# Altium PCB BOARD_4LAYER.PcbDoc (part 17 of 21)
Units mil, origin at the board's own origin, x right, y up, seen from the top; angles counter-clockwise.
Board outline 6692.91 x 10039.37 mil, 4 copper layers (Top Layer, Mid Layer 1, Mid Layer 2, Bottom Layer), stack 66.299 mil thick; 1532 components, 908 nets, 4105 pads, 1286 vias.
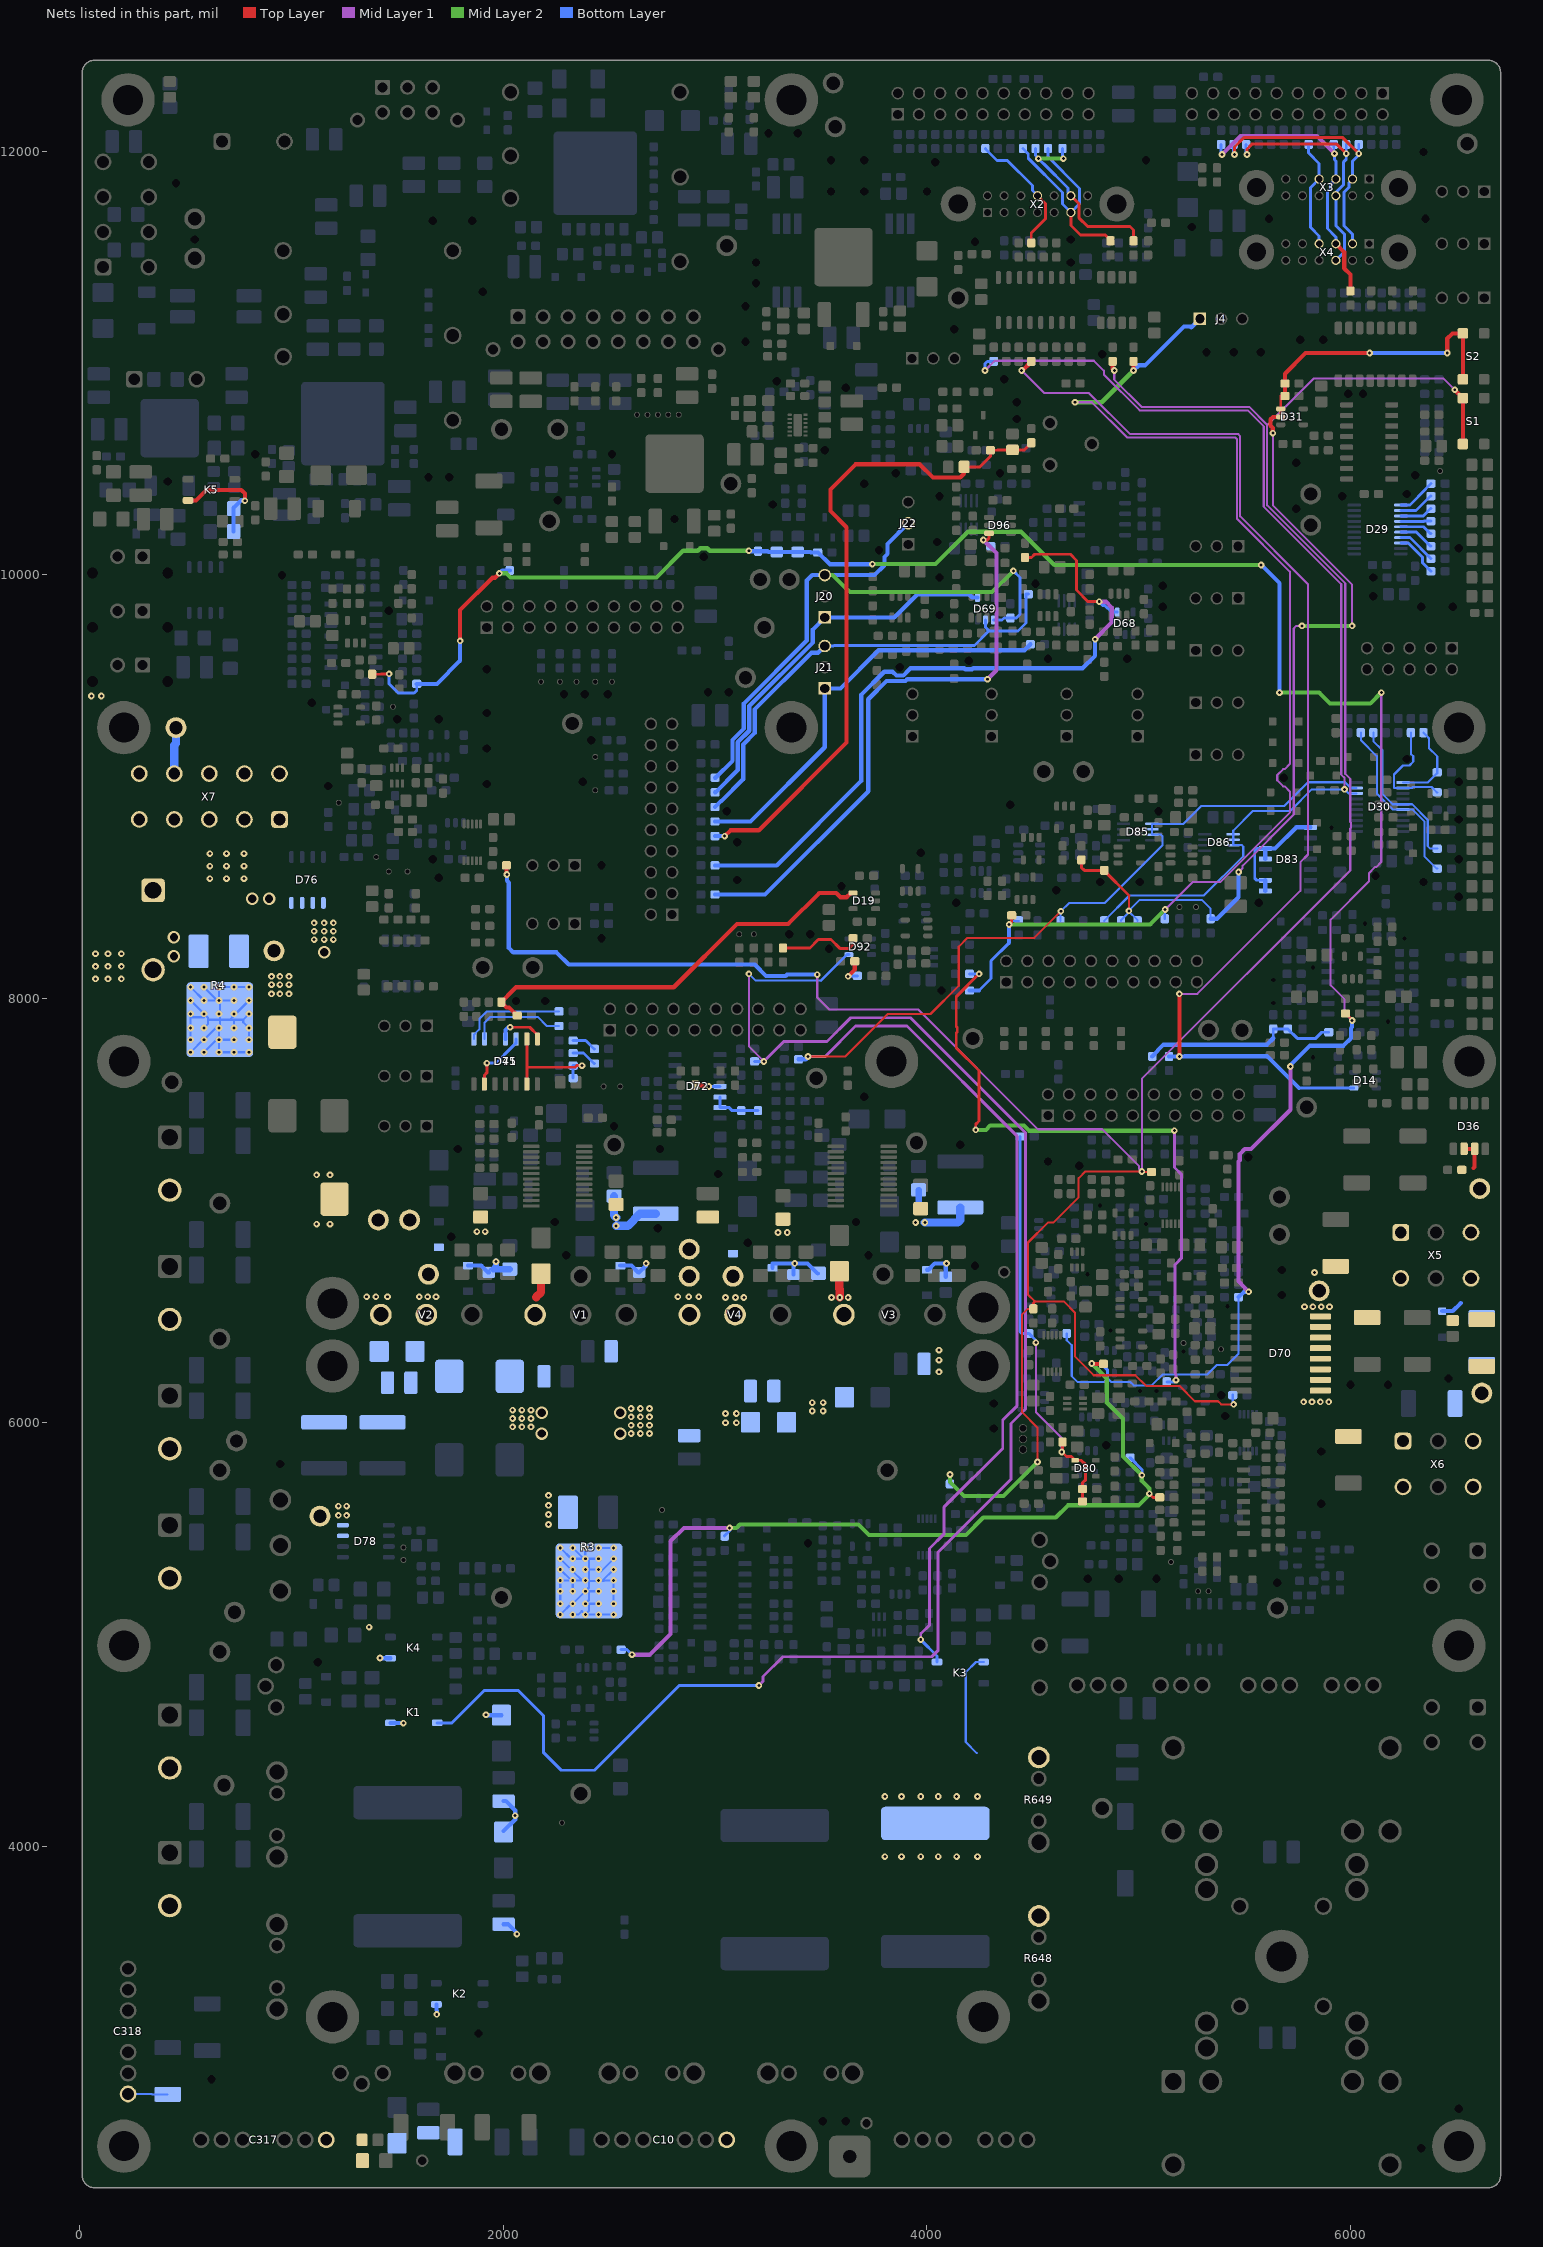
[diagram p19: the nets of this part, all layers, seen from the top]

## Via types
v1: diameter 27.56/31.5/31.5/27.56 (per signal layer), hole 13.78, Top Layer to Bottom Layer, 1270 vias
v2: diameter 59.06, hole 39.37, Top Layer to Bottom Layer, 16 vias

## Nets (pads, with @x,y where several pads share a name; then routed paths per layer and width w, separated by ;. In a path a pad name is that pad's centre, name@x,y a point inside that pad or via, vN(x,y) a via of type N, cw(c..) or ccw(c..) an arc to the next point about the centre after c; other vN are vias at no path point) (continued)
IND_BLOCING_T: D30.16 R159.1 R166.1 | length 846.7
  Bottom Layer w10: R166.1@6047.24,9255.91 6047.24,9220.99 6122.77,9145.47 6122.77,8968.73 6198.78,8892.72 D30.16@6246.06,8892.72 6292.05,8892.72 6347.2,8837.56 6347.2,8672.48 6405.51,8614.17 R159.1@6407.48,8614.17
IND_BLOCING_Z: D30.15 R158.1 R169.2 | length 744.7
  Bottom Layer w10: R169.2@6106.3,9255.91 6106.3,9215.99 6148.19,9174.11 6148.19,8967.59 6197.47,8918.31 D30.15@6246.06,8918.31 6288.95,8918.31 6363.11,8844.15 6363.11,8720.47 6374.92,8708.66 R158.1@6407.48,8708.66
IND_DELAY_WRITE: D30.12 R161.1 R167.1 | length 536.6
  Bottom Layer w10: R167.1@6283.46,9255.91 6283.46,9155.47 6294.37,9144.56 6294.37,9119.22 6276.45,9101.3 6246.37,9101.3 6203.66,9058.59 6203.66,8995.08 D30.12@6246.06,8995.08 6288.46,8995.08 6292.89,8999.5 6380.42,8999.5 6405.51,8974.41 R161.1@6407.48,8974.41
IND_DISCHARGE_CAP: D30.11 R162.1 R171.2 | length 398.8
  Bottom Layer w10: D30.11@6246.06,9020.67 6363.19,9020.67 6405.51,9062.99 6407.48,9062.99 R162.1@6407.48,9068.9 6407.48,9144.02 6368.86,9182.64 6368.86,9227.6 6367.61,9228.85 6367.61,9230.82 R171.2@6342.52,9255.91
IZL: D14.4 R13.2 R483.1 | length 5519.2
  Top Layer w19.68: v1(4446.85,10964.57) 4450.79,10964.57 4492.13,11005.91 R13.2@4492.13,11007.87 ; v1(5190.94,7728.35) v1(5190.94,8023.62)
  Mid Layer 1 w10: v1(4446.85,10964.57) 4552.55,10858.87 4764.04,10858.87 4958.44,10664.46 5468.56,10664.46 5477.88,10655.15 5477.88,10276.32 5798.05,9956.15 5798.05,8681.38 5761.93,8645.25 5761.93,8509.47 5276.08,8023.62 v1(5190.94,8023.62)
  Bottom Layer w13.78: 5754.72,7578.74 D14.4@6013.78,7578.74
  Bottom Layer w19.68: R483.1@5141.73,7728.35 v1(5190.94,7728.35) 5215.63,7728.35 5216.69,7729.41 5604.05,7729.41 5754.72,7578.74
IZL_A: C234.2 R345.1 R476.1 R491.1 | length 944.1
  Bottom Layer w13.78: 5633.86,7813.88 C234.2@5633.86,7858.27 R345.1@5702.76,7858.27 5747.37,7813.65 5834.24,7813.65 5863.11,7842.52 R491.1@5895.67,7842.52
  Bottom Layer w19.68: R476.1@5062.99,7728.35 5088.08,7753.44 5088.08,7755.41 5116.38,7783.7 5603.68,7783.7 5633.86,7813.88
IZL_UM: R9.1 R443.1 X2.11 | length 619.5
  Top Layer w13.78: R9.1@4492.13,11566.93 4492.13,11614.09 4560.07,11682.04 4560.07,11750.95 X2.11@4521.65,11789.37
  Bottom Layer w13.78: R443.1@4275.59,12011.81 4275.59,12009.84 4330.37,11955.07 4379.28,11955.07 4497.29,11837.05 4497.29,11813.73 X2.11@4521.65,11789.37
OFF_220V_PS: R429.1 X3.4 X4.4 | length 522.1
  Bottom Layer w13.78: R429.1@5801.18,12031.5 5801.18,11990.56 5850.39,11941.35 X3.4@5850.39,11868.11 5810.35,11828.07 5810.35,11639.89 5850.39,11599.85 X4.4@5850.39,11562.99
OFF_MOST: R49.1 R118.2 | length 400.2
  Top Layer w13.78: R49.1@3320.87,8240.16 3447.51,8240.16 3487.35,8280 3547.01,8280 3588.76,8238.25 3631.94,8238.25 3651.57,8257.89 R118.2@3651.57,8285.43
OFF_POWER: R47.2 R112.2 | length 128
  Top Layer w19.68: v1(3627.95,8106.3) 3659.45,8137.8 R47.2@3659.45,8177.17
  Bottom Layer w13.78: v1(3627.95,8106.3) 3629.92,8108.27 R112.2@3671.26,8108.27
ON/OFF_GEN: D68.4 R122.2 R515.1 | length 3426.8
  Top Layer w13.78: R122.2@4462.6,10082.68 4493.19,10082.68 4508.26,10097.74 4676.79,10097.74 4705.66,10068.87 4705.66,9928.5 4760.15,9874.02 v1(4812.99,9874.02)
  Mid Layer 1 w19.68: v1(4793.31,9696.85) 4871.6,9775.15 4871.6,9846.9 4844.49,9874.02 v1(4812.99,9874.02)
  Bottom Layer w13.78: v1(4812.99,9874.02) 4831.93,9855.07 4840.13,9855.07 4870.41,9824.8 D68.4@4897.64,9824.8
  Bottom Layer w19.68: R515.1@3000,8629.92 3291.17,8629.92 3689.6,9028.35 3689.6,9434.53 3798.4,9543.34 3837.77,9543.34 3855.67,9525.43 3888.42,9525.43 3911.57,9548.59 3922.72,9559.73 4175.71,9559.73 4180.48,9554.96 4213.22,9554.96 4217.99,9559.73 4734.56,9559.73 4793.31,9618.48 v1(4793.31,9696.85)
ON/OFF_MC: J4.1 R11.2 R109.1 R110.1 R114.2 R496.1 | length 5663.4
  Top Layer w13.78: v1(4387.8,8350.39) 4399.61,8362.2 R110.1@4399.61,8393.7
  Top Layer w19.68: v1(4974.41,10964.57) R11.2@4974.41,11007.87
  Mid Layer 1 w10: v1(4698.82,10814.96) 4777.9,10814.96 4944.3,10648.56 5454.91,10648.56 5461.98,10641.49 5461.98,10266.15 5712.13,10016 5712.13,9108.04 5687.98,9083.9 5680.4,9083.9 5652.48,9055.98 5652.48,9030.64 5680.4,9002.72 5687.98,9002.72 5712.13,8978.57 5712.13,8878.61 5385.68,8552.17 5254.92,8552.17 v1(5124.02,8421.26)
  Mid Layer 2 w19.68: v1(4387.8,8350.39) 5053.15,8350.39 v1(5124.02,8421.26) ; v1(4698.82,10814.96) 4824.54,10814.96 4951.87,10942.3 4952.14,10942.3 v1(4974.41,10964.57)
  Bottom Layer w10: v1@4387.8,8353.43 4402.48,8368.11 R496.1@4433.07,8368.11 ; R114.2@5122.05,8377.95 5122.05,8419.29 v1(5124.02,8421.26)
  Bottom Layer w13.78: 4245.36,8039.37 4302.17,8096.18 4302.17,8179.25 4387.8,8264.88
  Bottom Layer w19.68: R109.1@4200.79,8039.37 4245.36,8039.37 ; 4387.8,8264.88 v1(4387.8,8350.39) v1@4387.8,8353.43 ; v1(4974.41,10964.57) 4999.09,10989.25 5029,10989.25 5212.36,11172.61 5242.52,11172.61 5247.13,11168 J4.1@5287.8,11208.66
ON/OFF_PS: R29.2 R431.1 X3.2 X4.2 | length 1233
  Top Layer w13.78: v1(5450.79,11984.25) 5450.79,12019.03 5495.07,12063.32 5962.27,12063.32 v1(6037.4,11988.19)
  Bottom Layer w13.78: R29.2@5446.85,12031.5 5446.85,11988.19 v1(5450.79,11984.25) ; X4.2@6007.87,11562.99 6007.87,11607.79 5968.62,11647.04 5968.62,11807.04 5992.24,11830.67 5992.24,11852.48 X3.2@6007.87,11868.11 6007.87,11951.97 6037.4,11981.5 v1(6037.4,11988.19) R431.1@6037.4,12031.5
ON/OFF_UM: R34.2 R442.1 R615.1 X2.13 | length 910.8
  Top Layer w13.78: X2.13@4679.13,11789.37 4716.35,11752.15 4716.35,11685.81 4758.54,11643.62 4958.16,11643.62 4974.41,11627.38 R615.1@4974.41,11576.77
  Mid Layer 2 w19.68: v1(4525.59,11964.57) v1(4643.7,11964.57)
  Bottom Layer w13.78: R442.1@4511.81,12011.81 4511.81,11978.74 4525.59,11964.96 v1(4525.59,11964.57) 4550.28,11939.88 4550.67,11939.88 4665.2,11825.35 4665.2,11803.31 X2.13@4679.13,11789.37 ; R34.2@4639.76,12011.81 4639.76,11968.5 v1(4643.7,11964.57)
ON_POWER: D92.4 K1.2 R459.1 | length 8111.8
  Mid Layer 1 w10: v1(3159.45,8118.11) 3159.45,7775.59 v1(3230.32,7704.72)
  Mid Layer 1 w13.78: v1(3206.69,4759.84) 3226.88,4780.03 3226.88,4802.28 3320.4,4895.81 4022.95,4895.81 4051.22,4924.08 4051.22,5387.19 4396.92,5732.89 4396.92,5995.94 4465.13,6064.15 4465.13,7368.03 3922.21,7910.95 3640.08,7910.95 3527.9,7798.77 3324.36,7798.77 v1(3230.32,7704.72)
  Bottom Layer w10: v1(3159.45,8118.11) 3190.52,8087.04 3500.43,8087.04
  Bottom Layer w13.78: K1.2@1688.98,4583.86 1758.19,4583.86 1910.69,4736.36 2071.52,4736.36 2189.69,4618.19 2189.69,4444.81 2274.47,4360.04 2430.87,4360.04 2830.67,4759.84 v1(3206.69,4759.84) ; R459.1@3187.01,7704.72 v1(3230.32,7704.72) ; 3500.43,8087.04 3622.05,8208.66 D92.4@3631.89,8208.66
ON_VENT: K5.4 R577.1 R578.1 | length 511.2
  Top Layer w19.68: K5.4@513.78,10351.57 550.56,10351.57 600.18,10401.2 764.54,10401.2 781.5,10384.24 v1(781.5,10350.39)
  Bottom Layer w10: R578.1@728.35,10312.99 R578.1@728.35,10316.93
  Bottom Layer w19.68: R577.1@728.35,10204.72 R578.1@728.35,10312.99 ; R578.1@728.35,10316.93 765.25,10353.83 778.06,10353.83 v1(781.5,10350.39)
OUT_EN: D75.2 D75.13 R42.1 R579.2 | length 576.4
  Top Layer w13.78: D75.13@2111.81,7598.43 2111.81,7676.77 2112.2,7677.17 ; D75.2@2111.81,7811.02 2111.81,7677.56 2112.2,7677.17 ; v1(2372.05,7685.04) 2347.36,7685.04 2339.49,7677.17 2112.2,7677.17
  Bottom Layer w13.78: R579.2@2330.71,7625.98 R42.1@2330.71,7685.04 v1(2372.05,7685.04)
OUT_EN_OSC: R463.1 R584.2 | length 120.8
  Bottom Layer w13.78: R584.2@2330.71,7744.09 2379.92,7744.09 2429.13,7694.88 R463.1@2431.1,7694.88
OUT_F: D41.4 D75.1 | length 230.9
  Top Layer w13.78: v1(2033.46,7866.14) 2125.39,7866.14 2161.81,7829.72 D75.1@2161.81,7811.02
  Bottom Layer w19.68: D41.4@2011.81,7811.02 2011.81,7852.44 2025.51,7866.14 v1(2033.46,7866.14)
OUT_F_OSC: D41.1 R451.1 | length 495.4
  Bottom Layer w10: D41.1@1861.81,7811.02 1861.81,7829.72 1888.11,7856.03 1888.11,7904.99 1924.06,7940.94 R451.1@2263.78,7940.94
OUT_GEN: D96.6 R124.1 R507.1 | length 2763
  Top Layer w13.78: v1(4265.75,10165.35) 4284.53,10165.35 4292.91,10173.74 D96.6@4292.91,10196.85
  Mid Layer 1 w19.68: v1(4265.75,10165.35) 4328.14,10102.97 4328.14,9550.58 v1(4285.43,9507.87)
  Bottom Layer w13.78: v1(4265.75,10165.35) 4269.69,10165.35 4299.21,10135.83 R124.1@4301.18,10135.83
  Bottom Layer w19.68: R507.1@3000,8492.13 3235.78,8492.13 3722.91,8979.25 3722.91,9413.51 3809.24,9499.84 3845.07,9499.84 3899.02,9499.84 3907.07,9507.89 4260.73,9507.89 ; 4260.75,9507.87 v1(4285.43,9507.87)
OUT_GEN_EN: D69.2 J21.3 R123.2 R516.1 | length 2193.7
  Bottom Layer w13.78: J21.3@3517.72,9664.96 3558.15,9664.96 3560.5,9667.31 3762.55,9667.31 3762.59,9667.35 4223.81,9667.35 4291.75,9735.3 ; D69.2@4275.59,9787.4 4275.59,9752.95 4291.75,9736.79 4291.75,9735.3 ; R123.2@4478.35,9909.45 4467.11,9909.45 4467.11,9772.93 4429.48,9735.3 4317.85,9735.3 4291.75,9735.3
  Bottom Layer w19.68: R516.1@3000,8905.51 3028.51,8934.03 3030.48,8934.03 3132.97,9036.51 3132.97,9200.51 3187.03,9254.57 3187.03,9364.97 3455,9632.95 3485.7,9632.95 J21.3@3517.72,9664.96
OUT_GEN_F: D69.1 J20.3 J22.2 R508.1 R754.1 | length 3071.4
  Mid Layer 2 w19.68: J20.3@3517.72,9999.61 3554.21,9999.61 3615.34,9938.48 3616.89,9938.48 3636.35,9919.02 4306.82,9919.02 v1(4407.48,10019.68)
  Bottom Layer w13.78: D69.1@4312.99,9787.4 4353.27,9787.4 4363.11,9797.24 R754.1@4393.7,9797.24 4421.09,9797.24 4438.83,9814.98 4438.83,9988.34 v1(4407.48,10019.68)
  Bottom Layer w19.68: R508.1@3000,9043.31 3001.97,9043.31 3081.79,9123.13 3081.79,9221.71 3135.85,9275.77 3135.85,9393.19 3432.86,9690.21 3432.86,9973.56 3458.91,9999.61 J20.3@3517.72,9999.61 3752.87,9999.61 3798.94,10045.67 3798.94,10085.56 3813.15,10099.77 3813.15,10132.51 3813.15,10145.83 J22.2@3911.42,10244.09
OUT_GEN_F1: D69.4 J20.1 R630.2 | length 1812.9
  Bottom Layer w19.68: R630.2@3000,8974.41 3001.97,8974.41 3107.38,9079.82 3107.38,9211.11 3161.44,9265.17 3161.44,9381.7 3461.42,9681.68 3461.42,9743.31 J20.1@3517.72,9799.61 3845.68,9799.61 3955.1,9909.03 4198.26,9909.03 4213.58,9893.7 D69.4@4238.19,9893.7
PGND: C1.2 C2.2 C3.1 C8.1 C9.1 C10.1 C283.1 C285.1 C307.1 C308.1 C317.1 C318.1 H2.2 K1.3 K2.3 K3.3 K4.3 L15.2 R3.3 R4.3 R544.2 R601.2 R603.2 R604.2 R608.1 R609.1 R636.1 R640.1 R648.1 R649.1 TP1.1 TP2.1 TP3.1 TP4.1 V2.3 V4.3 V42.2 V43.2 V44.1 V53.2 V55.2 V59.2 V60.2 V61.2 X9.2 X10.2 X11.2 X12.2 X13.2 X14.2 | length 6163.9
  Bottom Layer w10: C318.1@230.31,2832.68 341.46,2832.68 343.43,2830.71 R640.1@417.32,2830.71 ; v1(525.59,7748.03) 586.61,7809.06 v1(588.58,7807.09) 647.64,7866.14 R4.3@663.39,7866.14 ; v1(525.59,7807.09) v1(525.59,7862.2) R4.3@525.59,7913.39 ; v1(525.59,7929.13) R4.3@525.59,7913.39 ; v1(525.59,7992.13) v1(588.58,7929.13) ; v1(525.59,8055.12) v1(588.58,7992.13) R4.3@651.57,7992.13 ; v1(588.58,7748.03) 647.64,7807.09 v1(659.45,7807.09) ; v1(588.58,7862.2) 608.27,7881.89 R4.3@608.27,7901.57 ; v1(588.58,8055.12) R4.3@651.57,7992.13 ; v1(659.45,7929.13) R4.3@663.39,7929.13 ; v1(730.32,7807.09) R4.3@663.39,7807.09 ; v1(730.32,7862.2) R4.3@730.32,7901.57 ; v1(730.32,7929.13) R4.3@730.32,7921.26 ; v1(730.32,7992.13) R4.3@663.39,7992.13 ; v1(801.18,7748.03) v1(730.32,7748.03) v1(659.45,7748.03) 659.45,7803.15 R4.3@663.39,7807.09 ; v1(801.18,7807.09) v1(801.18,7862.2) 773.62,7889.76 R4.3@773.62,7901.57 ; v1(801.18,7929.13) R4.3@773.62,7901.57 ; v1(801.18,7992.13) R4.3@730.32,7921.26 ; v1(801.18,8055.12) v1(730.32,8055.12) v1(659.45,8055.12) v1(659.45,7992.13) ; C283.1@1933.07,6708.66 1933.07,6718.5 1938.98,6724.41 C283.1@1953.62,6724.41 ; V60.2@2001.97,4068.9 V60.2@2001.97,4072.83 ; v1(2269.68,5094.49) 2324.8,5149.61 v1(2328.74,5145.67) v1(2387.8,5204.72) ; v1(2269.68,5145.67) v1(2269.68,5204.72) v1(2269.68,5255.91) R3.3@2320.87,5255.91 ; v1(2269.68,5307.09) R3.3@2320.87,5255.91 ; v1(2269.68,5358.27) R3.3@2328.74,5299.21 ; v1(2269.68,5409.45) 2324.8,5354.33 v1(2328.74,5358.27) R3.3@2379.92,5358.27 ; v1(2328.74,5094.49) 2354.33,5094.49 2371.06,5111.22 v1(2387.8,5094.49) ; v1(2328.74,5204.72) v1(2328.74,5255.91) ; v1(2328.74,5307.09) R3.3@2328.74,5299.21 ; v1(2328.74,5409.45) R3.3@2379.92,5358.27 ; v1(2387.8,5307.09) R3.3@2405.51,5307.09 ; v1(2450.79,5145.67) R3.3@2405.51,5145.67 ; v1(2450.79,5204.72) R3.3@2405.51,5204.72 ; v1(2450.79,5255.91) R3.3@2450.79,5253.94 ; v1(2450.79,5358.27) 2405.51,5358.27 R3.3@2405.51,5355.17 ; v1(2521.65,5094.49) v1(2450.79,5094.49) v1(2387.8,5094.49) ; v1(2521.65,5145.67) v1(2521.65,5204.72) v1(2521.65,5255.91) 2477.44,5255.91 2475.47,5253.94 R3.3@2468.5,5253.94 ; v1(2521.65,5307.09) R3.3@2468.5,5253.94 ; v1(2521.65,5358.27) 2460.63,5297.24 v1(2450.79,5307.09) R3.3@2405.51,5307.09 ; v1(2521.65,5409.45) v1(2450.79,5409.45) v1(2387.8,5409.45) 2387.8,5372.89 R3.3@2402.42,5358.27 ; C308.1@3484.25,6704.72 C308.1@3488.19,6704.72 ; 4235.02,4441.18 4183.03,4493.17 4183.03,4822.68 4231.22,4870.87 K3.3@4267.72,4870.87 ; R4.3@525.59,7913.39 588.58,7913.39 v1(588.58,7929.13) ; v1(588.58,7929.13) 608.27,7909.45 R4.3@608.27,7901.57 ; R4.3@608.27,7901.57 R4.3@663.39,7901.57 ; R4.3@651.57,7992.13 v1(659.45,7992.13) ; v1(659.45,7807.09) R4.3@663.39,7807.09 ; v1(659.45,7807.09) v1(659.45,7862.2) R4.3@663.39,7866.14 ; v1(659.45,7992.13) R4.3@663.39,7992.13 ; R4.3@663.39,7866.14 R4.3@663.39,7901.57 ; R4.3@663.39,7901.57 R4.3@710.63,7901.57 ; R4.3@663.39,7901.57 R4.3@663.39,7929.13 ; R4.3@663.39,7929.13 R4.3@663.39,7992.13 ; R4.3@710.63,7901.57 R4.3@730.32,7901.57 ; R4.3@710.63,7901.57 R4.3@730.32,7921.26 ; R4.3@730.32,7901.57 R4.3@773.62,7901.57 ; R3.3@2320.87,5255.91 v1(2328.74,5255.91) ; v1(2328.74,5255.91) R3.3@2372.05,5255.91 ; R3.3@2328.74,5299.21 R3.3@2372.05,5255.91 ; R3.3@2372.05,5255.91 v1(2387.8,5255.91) 2389.76,5253.94 R3.3@2405.51,5253.94 ; R3.3@2379.92,5358.27 v1(2387.8,5358.27) R3.3@2402.42,5358.27 ; v1(2387.8,5094.49) 2405.51,5112.2 R3.3@2405.51,5145.67 ; v1(2387.8,5204.72) 2405.51,5222.44 R3.3@2405.51,5253.94 ; v1(2387.8,5204.72) R3.3@2405.51,5204.72 ; R3.3@2402.42,5358.27 R3.3@2405.51,5355.17 ; R3.3@2405.51,5145.67 v1(2387.8,5145.67) 2405.51,5163.39 R3.3@2405.51,5204.72 ; R3.3@2405.51,5253.94 R3.3@2450.79,5253.94 ; R3.3@2405.51,5253.94 R3.3@2405.51,5307.09 ; R3.3@2405.51,5307.09 R3.3@2405.51,5355.17 ; R3.3@2450.79,5253.94 R3.3@2468.5,5253.94
  Bottom Layer w19.68: v1(1419.29,4889.76) 1420.08,4888.98 K4.3@1468.5,4888.98 ; K1.3@1468.5,4583.86 1528.35,4583.86 v1(1529.53,4582.68) ; K2.3@1685.04,3255.12 1685.04,3228.46 1688.44,3225.06 1688.44,3210.1 v1(1687.01,3208.66) ; V53.2@1834.65,6741.14 1896.65,6741.14 1929.13,6708.66 C283.1@1933.07,6708.66 ; v1(1919.29,4622.05) 1921.26,4620.08 V61.2@1992.13,4620.08 ; C8.1@2001.97,3633.86 2023.62,3633.86 2064.96,3592.52 v1(2064.96,3586.61) ; V60.2@2001.97,4072.83 2057.09,4127.95 v1(2057.09,4145.67) 2057.09,4170.37 2012.89,4214.57 C9.1@2001.97,4214.57 ; V55.2@3271.65,6731.3 3271.65,6751.97 v1@3372.05,6751.97 ; C285.1@3370.08,6698.82 3370.08,6750 v1@3372.05,6751.97 ; C308.1@3484.25,6704.72 3437.01,6751.97 v1(3375.98,6751.97) v1@3372.05,6751.97
  Bottom Layer w29.53: v1(1966.54,6759.84) 1966.54,6737.32 1953.62,6724.41 C307.1@2031.5,6724.41
  other v1: 3801.18,3952.76 3879.92,3952.76 3970.47,3952.76 4053.15,3952.76 4139.76,3952.76 4238.19,3952.76 3801.18,4236.22 3879.92,4236.22 3970.47,4236.22 4053.15,4236.22 4139.76,4236.22 4238.19,4236.22 1368.11,5035.43 3458.66,6055.12 3509.84,6055.12 3458.66,6094.49 3509.84,6094.49 4057.09,6240.16 4057.09,6295.28 4057.09,6342.52 1356.3,6594.49 1399.61,6594.49 1454.72,6594.49 2824.8,6594.49 2875.98,6594.49 2923.23,6594.49 3297.24,6897.64 3340.55,6897.64 1875.98,6901.57 1915.35,6901.57 57.09,9429.13 104.33,9429.13
ref: C178.1 C179.1 R70.1 R188.1 R324.1 R337.1 R349.1 R359.1 R372.1 R376.1 R391.1 R396.1 R403.1 R408.1 R473.1 | length 15123.3
  Top Layer w13.78: R324.1@1381.89,9531.5 1424.21,9531.5 1426.18,9533.46 v1(1462.6,9533.46) ; v1(5049.21,5665.35) 5066.93,5647.64 R396.1@5098.43,5647.64 ; R349.1@5974.41,7931.1 5976.38,7931.1 6005.91,7901.57 v1(6005.91,7897.64)
  Top Layer w19.68: v1(1797.24,9688.98) 1797.24,9834.65 1949.59,9986.99 1961.4,9986.99 v1(1982.28,10007.87) ; v1(4777.56,6279.53) 4779.53,6277.56 R359.1@4832.68,6277.56
  Mid Layer 1 w10: v1(6005.91,7897.64) 5970.47,7933.07 5970.47,7997.74 5904.45,8063.76 5904.45,8372.95 6085.55,8554.06 6085.55,8593.38 6113.47,8621.3 6119.56,8621.3 6143.7,8645.44 v1(6143.7,9444.88)
  Mid Layer 1 w19.68: v1(2608.27,4905.51) 2692.23,4905.51 2789.81,5003.09 2789.81,5440.94 2852.8,5503.94 v1(3068.9,5503.94) ; v1(5517.72,6618.11) 5498.87,6636.96 5498.87,6638.58 5470.03,6667.42 5470.03,7232.18 5476.22,7238.37 5476.22,7268.34 5499.38,7291.5 5529.34,7291.5 5714.57,7476.72 v1(5714.57,7681.1)
  Mid Layer 2 w19.68: v1(1982.28,10007.87) 2015.39,10007.87 2035.17,9988.1 2723.62,9988.1 2849.69,10114.17 2918.51,10114.17 2930.48,10126.14 2963.22,10126.14 2975.19,10114.17 v1(3159.45,10114.17) ; v1(3068.9,5503.94) 3100.39,5503.94 3116.42,5519.97 3677.15,5519.97 3726.22,5470.9 4183.32,5470.9 4265.42,5552.99 4607.71,5552.99 4664.88,5610.15 4997.88,5610.15 5049.21,5661.48 v1(5049.21,5665.35) 5049.21,5689.59 5046.8,5692.01 5046.8,5692.3 5013.78,5725.31 v1(5013.78,5751.97) 4925.32,5840.42 4925.32,6018.47 4848.43,6095.36 4848.43,6200.79 4848.43,6208.66 v1(4777.56,6279.53) ; v1(3742.13,10051.18) 4039.91,10051.18 4192.86,10204.12 4443.57,10204.12 4600.45,10047.24 v1(5576.77,10047.24) ; v1(5663.39,9444.88) 5850.56,9444.88 5902.36,9393.08 6091.9,9393.08 v1(6143.7,9444.88)
  Bottom Layer w10: v1(3742.13,10051.18) 3742.13,10050.86 v1@3742.33,10050.65 ; R376.1@4659.45,6421.26 4659.45,6388.7 4682.92,6365.23 4682.92,6219.52 4709.79,6192.65 4836.75,6192.65 4852.69,6208.6 4869.49,6191.81 4959.88,6191.81 4975.58,6176.1 5061.18,6176.1 5113.43,6228.35 5323.43,6228.35 5367.64,6272.56 5416.26,6272.56 5470.47,6326.77 R403.1@5470.47,6592.52
  Bottom Layer w13.78: v1(1462.6,9533.46) 1462.6,9485.68 1505.22,9443.05 1580.55,9443.05 1592.52,9455.02 R391.1@1592.52,9486.22 ; R372.1@2557.09,4929.13 2584.65,4929.13 v1(2608.27,4905.51) ; R408.1@3045.28,5464.57 3045.28,5466.54 3070.37,5491.63 3070.37,5502.47 v1(3068.9,5503.94) ; v1(4777.56,6279.53) 4820.93,6279.53 4852.69,6247.76 4852.69,6208.6 ; R337.1@4958.66,5834.65 5013.78,5779.53 v1(5013.78,5751.97)
  Bottom Layer w19.68: R391.1@1592.52,9486.22 1687.96,9486.22 1797.24,9595.51 v1(1797.24,9688.98) ; v1(1982.28,10007.87) 1996.06,10021.65 R473.1@2031.5,10021.65 ; v1(3159.45,10114.17) 3159.45,10112.2 R70.1@3202.76,10112.2 3246.97,10112.2 3250.91,10108.27 C179.1@3291.34,10108.27 C178.1@3389.76,10108.27 3449.72,10108.27 3451.69,10106.3 R188.1@3484.25,10106.3 3486.22,10106.3 3541.87,10050.65 v1@3742.33,10050.65 ; R403.1@5470.47,6592.52 5495.56,6617.61 5497.53,6617.61 5498.03,6618.11 v1(5517.72,6618.11) ; v1(5576.77,10047.24) 5594.23,10029.79 5594.78,10029.79 5663.39,9961.19 v1(5663.39,9444.88) ; v1(5714.57,7681.1) 5714.57,7684.24 5713.7,7685.11 5807.56,7778.96 5965.14,7778.96 6000.27,7814.1 6000.27,7861.26 6005.91,7866.9 v1(6005.91,7897.64)
ref_UM: C196.1 C197.1 R208.1 R382.2 R518.1 | length 3157.1
  Top Layer w13.78: C196.1@4175.2,10509.84 4249.25,10509.84 4299.21,10559.8 R208.1@4299.21,10588.58 4333.66,10588.58 4335.63,10590.55 C197.1@4403.54,10590.55 4460.63,10590.55 4492.13,10622.05 R382.2@4492.13,10624.02
  Top Layer w19.68: v1(3045.28,8767.72) 3072.68,8795.12 3121.15,8795.12 ; 3121.17,8795.14 3206.43,8795.14 3620.82,9209.53 3620.82,10224.96 3544.48,10301.3 3544.48,10404.05 3662.48,10522.05 3965.78,10522.05 4028.13,10459.69 4157.07,10459.69 4175.2,10477.82 C196.1@4175.2,10509.84
  Bottom Layer w19.68: R518.1@3000,8767.72 v1(3045.28,8767.72)
REZET: R6.2 R55.1 R62.1 R79.1 R91.1 R99.1 S1.1 S1.2 | length 13949.6
  Top Layer w10: R99.1@4501.97,6537.4 4474.93,6537.4 4447.48,6509.95 4447.48,6050.9 4521.65,5976.72 v1(4521.65,5814.96) ; R79.1@5059.06,7183.07 5013.78,7183.07 v1(5013.78,7185.04) 4746.3,7185.04 4715.46,7154.2 4715.46,7064.11 4595.5,6944.15 4570.3,6944.15 4476.37,6850.23 4476.37,6604.48 4508.45,6572.4 4644.58,6572.4 4699.22,6517.76 4699.22,6311.56 4786.83,6223.95 4983.29,6223.95 5034.01,6173.23 5192.47,6173.23 5264.27,6101.43 5373.02,6101.43 5387.84,6086.61 v1(5446.85,6086.61)
  Top Layer w13.78: R99.1@4501.97,6537.4 4501.97,6565.37 4508.45,6571.85 4508.45,6572.4
  Top Layer w19.68: R55.1@2015.75,8629.92 2015.75,8588.58 v1(2017.72,8586.61) ; R6.2@4875.98,11007.87 4875.98,10970.47 4881.89,10964.57 v1(4883.86,10964.57) ; v1(6490.16,10874.02) 6490.16,10873.23 S1.1@6528.74,10834.65 S1.2@6528.74,10618.11
  Mid Layer 1 w10: v1(3482.28,8114.17) 3482.28,8006.41 3539.22,7949.48 3958.88,7949.48 4523.51,7384.84 4826.54,7384.84 5001.21,7210.17 5001.21,7197.6 v1(5013.78,7185.04) 5013.78,7622.42 5997.13,8605.77 5997.13,8803.92 6001.06,8807.86 6001.06,8829.94 5997.13,8833.87 5997.13,9038.01 5973.54,9061.6 5973.54,9960.62 5605.24,10328.92 5605.24,10707.74 ; v1(4883.86,10964.57) 4883.86,10921.59 5012.33,10793.12 5519.86,10793.12 5605.24,10707.74 ; v1(6490.16,10874.02) 6437.59,10926.58 5824.08,10926.58 5605.24,10707.74
  Mid Layer 2 w19.68: v1(4108.27,5755.91) 4108.27,5720.15 4174.26,5654.15 4360.85,5654.15 v1(4521.65,5814.96)
  Bottom Layer w13.78: R91.1@4108.27,5710.63 v1(4108.27,5755.91) ; R62.1@5442.91,6129.92 5442.91,6090.55 v1(5446.85,6086.61)
  Bottom Layer w19.68: v1(2017.72,8586.61) 2017.72,8557.09 2026.93,8547.88 2026.93,8240.37 2047.82,8219.48 2251.56,8219.48 2309.77,8161.27 3187.16,8161.27 3240.64,8107.79 3333.33,8107.79 3339.72,8114.17 v1(3482.28,8114.17)
REZET_PS: R31.2 R432.1 X3.9 X4.9 | length 1171.8
  Top Layer w13.78: v1(5509.84,11984.25) 5509.84,12010.28 5532.15,12032.59 5933.95,12032.59 v1(5978.35,11988.19)
  Bottom Layer w13.78: R31.2@5505.91,12031.5 5505.91,11988.19 v1(5509.84,11984.25) ; X4.9@5929.13,11484.25 5969.14,11524.25 5969.14,11609.34 5929.13,11649.35 X3.9@5929.13,11789.37 5929.13,11805.3 5966.2,11842.36 5966.2,11949.46 5978.35,11961.61 v1(5978.35,11988.19) R432.1@5978.35,12031.5
REZET_UM: R33.1 R438.1 R616.1 X2.6 | length 1054.5
  Top Layer w13.78: X2.6@4679.13,11710.63 4679.13,11649.04 4724.34,11603.83 4841.05,11603.83 4866.14,11578.74 R616.1@4866.14,11576.77
  Bottom Layer w13.78: R438.1@4452.76,12011.81 4477.85,11986.72 4477.85,11965.94 4639.76,11804.02 4639.76,11750 X2.6@4679.13,11710.63 4719.99,11751.49 4719.99,11824.16 4570.87,11973.28 R33.1@4570.87,12011.81
SY_FLT: D72.12 D72.13 R51.1 R255.1 | length 235
  Bottom Layer w13.78: D72.12@3023.62,7536.61 D72.13@3023.62,7486.61 3066.93,7486.61 3081.1,7472.44 R255.1@3124.02,7472.44 R51.1@3202.76,7472.44
SY_FLT_OSC: D72.11 R457.1 | length 118.6
  Top Layer w19.68: R457.1@2907.48,7592.52 2938.98,7592.52 2944.88,7586.61 v1(2970.47,7586.61)
  Bottom Layer w13.78: v1(2970.47,7586.61) D72.11@3023.62,7586.61
TABU_UM: D19.4 R43.2 R452.1 | length 1992.2
  Top Layer w19.68: R452.1@2066.93,7921.26 2028.51,7959.67 2016.7,7959.67 R43.2@1992.13,7984.25 2020.64,8012.77 2020.64,8014.73 2060.38,8054.47 2805.06,8054.47 3103.77,8353.18 3345.21,8353.18 3492.02,8500 3572.05,8500 3592.69,8479.36 3621.09,8479.36 3641.73,8500 D19.4@3651.57,8500
TEMP: C99.2 D80.1 R205.1 R377.2 R626.2 R707.1 | length 1956.8
  Top Layer w13.78: R707.1@4639.76,5909.45 4639.76,5873.22 4635.83,5869.28 v1(4635.83,5862.2) 4657.81,5840.22 4681.43,5840.22 D80.1@4698.82,5822.83 4727.44,5822.83 4748.7,5801.58 4748.7,5731 4734.25,5716.55 R377.2@4734.25,5687.01 C99.2@4734.25,5627.95
  Mid Layer 1 w10: v1(4513.78,6377.95) 4513.78,6050.22 4635.83,5928.18 v1(4635.83,5862.2)
  Bottom Layer w13.78: R626.2@4438.98,7350.39 4438.98,6429.38 4447.1,6421.26 R205.1@4482.28,6421.26 4482.28,6419.29 4513.78,6387.8 v1(4513.78,6377.95)
U1: D29.12 R138.1 | length 169.9
  Bottom Layer w13.78: D29.12@6236.22,10304.13 6307.37,10304.13 6330.55,10327.31 6331.25,10327.31 6375.98,10372.05 R138.1@6377.95,10372.05
U2: D29.13 R137.1 | length 156
  Bottom Layer w13.78: D29.13@6236.22,10278.54 6341.54,10278.54 6375.98,10312.99 R137.1@6377.95,10312.99
U3: D29.14 R136.1 | length 142.1
  Bottom Layer w13.78: D29.14@6236.22,10252.95 6344.41,10252.95 6345.39,10253.94 R136.1@6377.95,10253.94
U4: D29.15 R135.1 | length 155.2
  Bottom Layer w13.78: D29.15@6236.22,10227.36 6343.5,10227.36 6375.98,10194.88 R135.1@6377.95,10194.88
U5: D29.16 R134.1 | length 169
  Bottom Layer w13.78: D29.16@6236.22,10201.77 6310.04,10201.77 6375.98,10135.83 R134.1@6377.95,10135.83
U_Fin: D70.5 D70.6 D70.7 D70.8 R129.2 R654.2 TP29.1 X5.1 X5.4
  other v1: 5781.5,6547.24 5820.87,6547.24 5860.24,6547.24 5899.61,6547.24 5828.74,6708.66
U_MOST: D78.3 D78.4 R3.1 TP9.1
  other v1: 2214.57,5519.69 1222.44,5562.99 1261.81,5562.99 2214.57,5566.93 1222.44,5606.3 1261.81,5606.3 2214.57,5610.24 2214.57,5657.48
U_TP: D76.3 D76.4 X1.1 X7.1 X7.2 X7.3 X7.4 X7.5
  other v1: 616.14,8566.93 694.88,8566.93 777.56,8566.93 616.14,8625.98 694.88,8625.98 777.56,8625.98 616.14,8685.04 694.88,8685.04 777.56,8685.04
  other v2: 816.93,8472.44 895.67,8472.44
U_TS: D70.1 D70.2 D70.3 D70.4 R632.1 X6.1 X6.4
  other v1: 5777.56,6098.43 5816.93,6098.43 5856.3,6098.43 5895.67,6098.43
UH: C282.1 C301.1 C303.1 D76.1 D76.2 R1.1 R598.2 R599.2 R600.2 R607.1 R608.2 TP38.1 V1.3 V2.2 V33.1 V42.1 V45.2 V52.2 | length 594
  Top Layer w39.37: 2156.28,6592.54 2179.13,6615.39 V33.1@2179.13,6702.76
  Bottom Layer w19.68: V52.2@2553.15,6741.14 2605.32,6741.14 2637.8,6708.66 C282.1@2641.73,6708.66 2673.2,6740.13 2673.2,6749.97 v1(2675.2,6751.97)
  Bottom Layer w39.37: C303.1@2523.62,7068.9 2523.62,6978.35 v1(2533.46,6968.5) ; v1(2533.46,6929.13) 2588.58,6929.13 2645.67,6986.22 C301.1@2720.47,6986.22
  other v1: 1604.33,6594.49 1643.7,6594.49 1683.07,6594.49 1120.08,6937.01 1183.07,6937.01 1120.08,7169.29 1183.07,7169.29 1108.27,8279.53 1155.51,8279.53 1198.82,8279.53 1108.27,8318.9 1155.51,8318.9 1198.82,8318.9 1108.27,8358.27 1155.51,8358.27 1198.82,8358.27
  other v2: 1155.51,8220.47
UL: C284.1 C302.1 C304.1 C305.1 C306.1 R2.2 R4.2 R602.2 R609.2 R610.1 TP5.1 TP43.1 V3.3 V4.2 V37.1 V43.1 V46.2 V54.2 | length 624.1
  Top Layer w39.37: V37.1@3586.61,6714.57 3586.61,6631.89 3588.58,6629.92 v1(3588.58,6590.55)
  Bottom Layer w19.68: V54.2@4000,6721.46 4005.91,6721.46 4036.42,6751.97 v1(4092.52,6751.97) 4088.58,6748.03 C284.1@4088.58,6688.98
  Bottom Layer w29.53: C304.1@3960.63,7098.43 3960.63,7004.63 3963.79,7001.47
  Bottom Layer w39.37: v1(3990.16,6944.88) 4145.67,6944.88 4157.48,6956.69 C302.1@4157.48,7015.75
  other v1: 2604.33,5948.82 2647.64,5948.82 2690.94,5948.82 2045.28,5980.31 2088.58,5980.31 2131.89,5980.31 2604.33,5988.19 2647.64,5988.19 2690.94,5988.19 3049.21,6000 3100.39,6000 2045.28,6019.69 2088.58,6019.69 2131.89,6019.69 2604.33,6027.56 2647.64,6027.56 2690.94,6027.56 3049.21,6043.31 3100.39,6043.31 2045.28,6059.06 2088.58,6059.06 2131.89,6059.06 2604.33,6066.93 2647.64,6066.93 2690.94,6066.93 3049.21,6590.55 3096.46,6590.55 3135.83,6590.55 3549.21,6590.55 3627.95,6590.55 3946.85,6944.88 907.48,8023.62 946.85,8023.62 990.16,8023.62 907.48,8066.93 946.85,8066.93 990.16,8066.93 907.48,8106.3 946.85,8106.3 990.16,8106.3
  other v2: 2183.07,5948.82 2553.15,5948.82 2183.07,6047.24 2553.15,6047.24
Umax: D29.18 R132.1 | length 211.8
  Bottom Layer w13.78: D29.18@6236.22,10150.59 6270.7,10150.59 6338.84,10082.45 6338.84,10056.83 R132.1@6377.95,10017.72
Umin: D29.11 R139.1 | length 184.9
  Bottom Layer w13.78: D29.11@6236.22,10329.72 6278.62,10329.72 6352.9,10404 6352.9,10406.05 R139.1@6377.95,10431.1
Unom: D29.17 R133.1 | length 182.9
  Bottom Layer w13.78: D29.17@6236.22,10176.18 6278.54,10176.18 R133.1@6377.95,10076.77
WRITE_MC: D31.1 D31.2 R10.2 R107.1 R113.1 R115.2 R120.1 R229.2 R501.1 S2.1 S2.2 | length 5400.6
  Top Layer w10: v1(4952.76,8415.35) 4952.76,8488.19
  Top Layer w13.78: R107.1@4728.35,8655.51 4728.35,8620.36 4742.41,8606.3 R120.1@4836.61,8606.3 4836.61,8604.33 4952.76,8488.19 ; D31.2@5669.29,10746.06 D31.1@5669.29,10783.46 5669.29,10844.49 R229.2@5688.98,10844.49
  Top Layer w19.68: v1(5631.89,10669.29) 5631.89,10693.98 5621.61,10704.26 5621.61,10734.83 5632.84,10746.06 D31.2@5669.29,10746.06 ; R229.2@5688.98,10844.49 R10.2@5688.98,10903.54 5688.98,10949.6 5786.62,11047.24 v1(6088.58,11047.24) ; v1(6454.72,11047.24) 6454.72,11115.24 6479.25,11139.76 S2.1@6528.74,11139.76 S2.2@6528.74,10923.23
  Mid Layer 1 w10: v1(5470.47,8598.43) 5489.32,8617.27 5489.32,8628.31 5730.89,8869.88 5730.89,9747.7 5743.03,9759.84 v1(5769.69,9759.84) ; v1(5631.89,10669.29) 5631.89,10328.37 6005.91,9954.35 v1(6005.91,9759.84)
  Mid Layer 2 w19.68: v1(5769.69,9759.84) v1(6005.91,9759.84)
  Bottom Layer w10: R501.1@4915.35,8368.11 4915.35,8370.08 4950.79,8405.51 v1@4950.79,8413.39 ; R113.1@4994.09,8368.11 4994.09,8370.08 v1@4950.79,8413.39 ; R115.2@5338.58,8377.95 5338.58,8424.7 5296.23,8467.05 5004.45,8467.05 v1(4952.76,8415.35) v1@4950.79,8413.39
  Bottom Layer w19.68: R115.2@5338.58,8377.95 5369.17,8377.95 5470.47,8479.25 v1(5470.47,8598.43) ; v1(6088.58,11047.24) v1(6454.72,11047.24)
WRITE_PS: R30.1 R436.1 R614.1 X3.3 X4.3 | length 1414.4
  Top Layer w19.68: X4.3@5929.13,11562.99 5968.5,11523.62 5968.5,11447.34 5998.03,11417.81 R614.1@5998.03,11340.55
  Mid Layer 1 w19.68: v1(5391.73,11984.25) 5479.42,12071.94 5839.48,12071.94 v1(5923.23,11988.19)
  Bottom Layer w13.78: R30.1@5387.8,12031.5 5387.8,11988.19 v1(5391.73,11984.25) ; R436.1@5919.29,12031.5 5919.29,11985.51 v1@5923.23,11981.57 ; v1(5923.23,11988.19) v1@5923.23,11981.57 ; X4.3@5929.13,11562.99 5929.13,11594.77 5889.43,11634.47 5889.43,11807.82 5904.77,11823.16 5904.77,11843.75 X3.3@5929.13,11868.11 5929.13,11953.48 5923.23,11959.39 v1@5923.23,11981.57
~BLOCING: D83.1 D83.2 D83.4 D83.5 D83.8 | length 592.1
  Bottom Layer w13.78: D83.2@5596.46,8559.45 5556.43,8559.45 5546.69,8569.19 5546.69,8699.71 5556.43,8709.45 D83.5@5596.46,8709.45
  Bottom Layer w19.68: D83.1@5596.46,8509.45 D83.2@5596.46,8559.45 ; D83.4@5596.46,8659.45 D83.5@5596.46,8709.45 5642.71,8709.45 5742.71,8809.45 D83.8@5809.06,8809.45
~BLOCING_AMP: R68.1 R119.1 | length 3088.5
  Top Layer w13.78: v1(4230.31,7381.89) 4230.31,7408.46 4245.59,7423.74 4245.59,7661.26 4138.13,7768.72 4138.13,7838.74 4142.72,7843.32 4142.72,7865.34 4138.13,7869.93 4138.13,8010.18 v1(4246.06,8118.11)
  Mid Layer 1 w13.78: v1(5167.32,7377.95) 5167.32,7204.54 5201.88,7169.98 5201.88,6778 5171,6747.11 5171,6231.64 5175.2,6227.44 v1(5175.2,6200.79)
  Mid Layer 2 w19.68: v1(4230.31,7381.89) 4278.54,7381.89 4298.33,7401.67 4457.94,7401.67 4481.66,7377.95 v1(5167.32,7377.95)
  Bottom Layer w13.78: R119.1@4200.79,8118.11 v1(4246.06,8118.11) ; R68.1@5131.89,6192.91 5167.32,6192.91 v1(5175.2,6200.79)
~DELAY_WRITE: D30.8 D86.1 D86.2 D86.3 R19.2 R504.1 | length 5037.3
  Mid Layer 1 w10: v1(4273.62,10964.57) 4320.12,11011.06 4787.31,11011.06 4834.71,10963.66 4834.71,10945.65 5003.91,10776.45 5514.04,10776.45 5589.22,10701.27 5589.22,10322.44 5954.99,9956.68 5954.99,9057.66 5970.47,9042.17 v1(5970.47,8988.19)
  Bottom Layer w10: R504.1@4836.61,8368.11 4955.83,8487.33 5306.4,8487.33 5492.14,8673.07 5492.14,8718.32 5485.07,8725.39 D86.3@5444.88,8725.39 D86.2@5444.88,8750.98 D86.1@5444.88,8776.57 5444.88,8793.39 5538.62,8887.12 5715.08,8887.12 5816.15,8988.19 v1(5970.47,8988.19) 5989.17,8969.49 D30.8@6025.59,8969.49
  Bottom Layer w13.78: v1(4273.62,10964.57) 4273.62,10996.76 4284.74,11007.87 R19.2@4314.96,11007.87
~DISCHARGE_CAP: D30.9 D85.1 D85.2 D85.3 K3.2 R455.1 R502.1 | length 7462.9
  Top Layer w10: v1(3438.98,7728.35) 3615.32,7728.35 3815.2,7928.23 4016.97,7928.23 4149.87,8061.13 4149.87,8246.31 4191.02,8287.45 4505.96,8287.45 v1(4631.89,8413.39)
  Mid Layer 1 w13.78: v1(3438.98,7728.35) 3519.93,7728.35 3663.16,7871.58 3905.9,7871.58 4425.76,7351.72 4425.76,6080.46 4357.55,6012.24 4357.55,5878.8 4079.65,5600.91 4079.65,5473.65 4011.85,5405.84 4011.85,5044.4 3972.36,5004.92 3970.47,5004.92 v1(3970.47,4976.38)
  Bottom Layer w10: R502.1@4629.92,8368.11 4629.92,8414.13 4630.53,8414.74 v1(4631.89,8413.39) 4670.63,8452.13 4838.99,8452.13 5111.42,8724.55 5111.42,8766.62 5103.43,8774.61 D85.3@5061.02,8774.61 D85.2@5061.02,8800.2 D85.1@5061.02,8825.79 5210.25,8825.79 5294.32,8909.86 5685.68,8909.86 5797.91,9022.09 5972.67,9022.09 5999.68,8995.08 D30.9@6025.59,8995.08
  Bottom Layer w13.78: v1(3970.47,4976.38) 4047.24,4899.61 K3.2@4047.24,4870.87
  Bottom Layer w19.68: R455.1@3393.7,7714.57 3428.15,7714.57 3438.98,7725.39 v1(3438.98,7728.35)
~OUT_EN_OSC: R50.1 R456.1 | length 116.7
  Bottom Layer w13.78: R50.1@2330.71,7803.15 2389.76,7803.15 2429.13,7763.78 R456.1@2431.1,7763.78
~OUT_F: D41.5 D75.9 | length 300.1
  Top Layer w13.78: D75.9@1911.81,7598.43 1911.81,7639.84 1923.23,7651.26 v1(1923.23,7696.85)
  Bottom Layer w13.78: v1(1923.23,7696.85) 1966.54,7696.85 2043.44,7773.76 2043.44,7773.95 2061.81,7792.32 D41.5@2061.81,7811.02
~OUT_F_OSC: D41.2 R462.1 | length 456.7
  Bottom Layer w10: D41.2@1911.81,7811.02 1911.81,7886.3 1940.25,7914.74 2163.91,7914.74 2206.6,7872.05 R462.1@2263.78,7872.05
~OUT_GEN_EN: J21.1 R517.1 R540.2 | length 1997.5
  Bottom Layer w19.68: R517.1@3000,8836.61 3167.24,8836.61 3517.72,9187.09 J21.1@3517.72,9464.96 3592.22,9464.96 3771.97,9644.71 4459.67,9644.71 R540.2@4488.19,9673.23
~U_Fin: C236.2 D36.2 D36.3 H1.2 R641.2 R642.2 TP26.1 V18.2 X5.3 X5.6 | length 247
  Top Layer w19.68: D36.2@6534.06,7292.13 D36.3@6584.06,7292.13 6584.06,7206.91 6578.26,7201.11
  Bottom Layer w19.68: V18.2@6431.1,6526.57 6480.65,6526.57 6518.87,6564.79
~U_TP: R4.1 TP10.1 X1.2 X7.6 X7.7 X7.8 X7.9 X7.10 | length 219.8
  Bottom Layer w39.37: X7.9@448.82,9062.99 448.82,9196.85 456.69,9204.72 TP10.1@456.69,9279.53
  other v1: 76.77,8094.49 135.83,8094.49 198.82,8094.49 76.77,8153.54 135.83,8153.54 198.82,8153.54 76.77,8212.6 135.83,8212.6 198.82,8212.6
  other v2: 446.85,8200.79 446.85,8291.34
~U_TS: R634.2 R641.1 R642.1 TP11.1 X6.3 X6.6
pads on no net: C10. C11. C12. C316. C317. C318. D6.2 D6.7 D7.2 D7.7 D8.2 D8.7 D9.2 D9.7 D10.2 D10.7 D32.7 D32.10 D33.7 D33.10 D38.13 D38.14 D38.15 D38.16 D38.17 D38.22 D39.13 D39.14 D39.15 D39.16 D39.17 D39.22 D47.14 D47.15 D47.16 D47.17 D47.26 D47.27 D47.28 D70.9 D70.16 D74.3 D74.6 D74.11 D74.14 D74.15 D75.3 D75.11 D83.3 D83.11 J5.1 J6.1 J7.1 L13. R643. R644. R645. R646. R647. R648. R649. X2. X3. X4. X5.2 X5.5 X6.2 X6.5 X24. X25. X26. X29. X30.

## Polygon pours and split planes (outlines as drawn)
$4N4003 on Bottom Layer "$4N4003_L02_P652" (solid, remove dead copper, pour order 652): 112.2,10726.38 171.26,10785.43 112.2,10785.43
$4N4003 on Bottom Layer "$4N4003_L02_P651" (solid, remove dead copper, pour order 651): 112.2,10785.43 181.1,10785.43 181.1,10883.86 112.2,10883.86
$4N4003 on Bottom Layer "$4N4003_L02_P650" (solid, remove dead copper, pour order 650): 33.46,10509.84 112.2,10509.84 112.2,10883.86 33.46,10883.86
$4N4003 on Bottom Layer "$4N4003_L02_P649" (solid, remove dead copper, pour order 649): 33.46,10460.63 387.8,10460.63 387.8,10509.84 33.46,10509.84
$4N4003 on Bottom Layer "$4N4003_L02_P648" (solid, remove dead copper, pour order 648): 230.31,10342.52 387.8,10342.52 387.8,10460.63 230.31,10460.63
$6N103 on Bottom Layer "$6N103_L02_P647" (solid, remove dead copper, pour order 647): 4994.09,4043.31 4679.13,4043.31 4679.13,4535.43 4462.6,4535.43 4462.6,4811.02 4541.34,4811.02 4541.34,4633.86 4816.93,4633.86 4816.93,4377.95 4994.09,4377.95
I_AMP on Bottom Layer "I_AMP_L02_P644" (solid, remove dead copper, pour order 644): 4620.08,4692.91 4974.41,4692.91 4974.41,4870.08 4620.08,4870.08
I_AMP on Bottom Layer "I_AMP_L02_P643" (solid, remove dead copper, pour order 643): 5289.37,4870.08 4620.08,4870.08 4620.08,4889.76 4482.28,4889.76 4482.28,5007.87 5289.37,5007.87
GND_UM on Bottom Layer "GND_UM_L02_P636" (solid, remove dead copper, pour order 636): 4797.24,11336.61 5742.13,11336.61 5742.13,11375.98 4797.24,11375.98
GND_UM on Bottom Layer "GND_UM_L02_P635" (solid, remove dead copper, pour order 635): 6145.67,11464.57 6342.52,11464.57 6342.52,11907.48 6145.67,11907.48
GND_UM on Bottom Layer "GND_UM_L02_P634" (solid, remove dead copper, pour order 634): 6175.2,11907.48 6273.62,12005.91 6273.62,11907.48
GND_UM on Bottom Layer "GND_UM_L02_P618" (solid, remove dead copper, pour order 618): 5663.39,11267.72 5742.13,11267.72 5742.13,11336.61 5663.39,11336.61
GND_UM on Bottom Layer "GND_UM_L02_P617" (solid, remove dead copper, pour order 617): 5663.39,11188.98 5879.92,11188.98 5879.92,11267.72 5663.39,11267.72
GND_UM on Bottom Layer "GND_UM_L02_P616" (solid, remove dead copper, pour order 616): 5043.31,12340.55 5250,12340.55 5250,12389.76 5043.31,12389.76
GND_UM on Bottom Layer "GND_UM_L02_P615" (solid, remove dead copper, pour order 615): 4994.09,12114.17 5043.31,12114.17 5043.31,12389.76 4994.09,12389.76
GND_UM on Bottom Layer "GND_UM_L02_P614" (solid, remove dead copper, pour order 614): 5092.52,11986.22 5151.57,11927.17 5092.52,11927.17
GND_UM on Bottom Layer "GND_UM_L02_P613" (solid, remove dead copper, pour order 613): 5092.52,11740.16 5151.57,11740.16 5151.57,11927.17 5092.52,11927.17
GND_UM on Bottom Layer "GND_UM_L02_P612" (solid, remove dead copper, pour order 612): 4954.72,11740.16 5092.52,11740.16 5092.52,12114.17 4954.72,12114.17
GND_UM on Bottom Layer "GND_UM_L02_P611" (solid, remove dead copper, pour order 611): 4187.01,11375.98 4226.38,11336.61 4226.38,11375.98
GND_UM on Bottom Layer "GND_UM_L02_P610" (solid, remove dead copper, pour order 610): 4226.38,11228.35 4285.43,11228.35 4285.43,11375.98 4226.38,11375.98
GND_UM on Bottom Layer "GND_UM_L02_P609" (solid, remove dead copper, pour order 609): 4068.9,11375.98 4285.43,11375.98 4285.43,11641.73 4068.9,11641.73
GND_UM on Bottom Layer "GND_UM_L02_P608" (solid, remove dead copper, pour order 608): 3458.66,11671.26 3488.19,11700.79 3488.19,11671.26
GND_UM on Bottom Layer "GND_UM_L02_P607" (solid, remove dead copper, pour order 607): 3832.68,11454.72 3763.78,11385.83 3763.78,11454.72
GND_UM on Bottom Layer "GND_UM_L02_P606" (solid, remove dead copper, pour order 606): 3763.78,11454.72 3832.68,11454.72 3832.68,12045.28 3763.78,12045.28
GND_UM on Bottom Layer "GND_UM_L02_P605" (solid, remove dead copper, pour order 605): 3458.66,11228.35 3488.19,11228.35 3488.19,11346.46 3458.66,11346.46
GND_UM on Bottom Layer "GND_UM_L02_P604" (solid, remove dead copper, pour order 604): 3488.19,11228.35 3763.78,11228.35 3763.78,12389.76 3488.19,12389.76
GND_UM on Bottom Layer "GND_UM_L02_P602" (solid, remove dead copper, pour order 602): 6273.62,11907.48 6687.01,11907.48 6687.01,12389.76 6273.62,12389.76
GND_UM on Bottom Layer "GND_UM_L02_P601" (solid, remove dead copper, pour order 601): 3458.66,11346.46 3488.19,11346.46 3488.19,11671.26 3458.66,11671.26
GND_UM on Bottom Layer "GND_UM_L02_P598" (solid, remove dead copper, pour order 598): 4521.65,12320.87 4994.09,12320.87 4994.09,12389.76 4521.65,12389.76
$4N2819 on Bottom Layer "$4N2819_L02_P591" (solid, remove dead copper, pour order 591): 1185.04,11917.32 2120.08,11917.32 2120.08,12094.49 1185.04,12094.49
$4N2819 on Bottom Layer "$4N2819_L02_P588" (solid, remove dead copper, pour order 588): 1185.04,12035.43 1263.78,12035.43 1263.78,12153.54 1185.04,12153.54
$4N2811 on Bottom Layer "$4N2811_L02_P584" (solid, remove dead copper, pour order 584): 1372.05,11710.63 2120.08,11710.63 2120.08,11868.11 1372.05,11868.11
$4N2807 on Bottom Layer "$4N2807_L02_P578" (solid, remove dead copper, pour order 578): 919.29,11169.29 1460.63,11169.29 1460.63,11346.46 919.29,11346.46
$4N2806 on Bottom Layer "$4N2806_L02_P575" (solid, remove dead copper, pour order 575): 1076.77,11582.68 1509.84,11582.68 1509.84,11671.26 1076.77,11671.26
$4N2806 on Bottom Layer "$4N2806_L02_P574" (solid, remove dead copper, pour order 574): 1509.84,11090.55 1559.06,11090.55 1559.06,11671.26 1509.84,11671.26
$4N2806 on Bottom Layer "$4N2806_L02_P573" (solid, remove dead copper, pour order 573): 919.29,10972.44 1559.06,10972.44 1559.06,11090.55 919.29,11090.55
$4N4014 on Bottom Layer "$4N4014_L02_P569" (solid, remove dead copper, pour order 569): 466.54,9712.6 515.75,9712.6 515.75,9761.81 466.54,9761.81
$4N4014 on Bottom Layer "$4N4014_L02_P568" (solid, remove dead copper, pour order 568): 427.17,9761.81 683.07,9761.81 683.07,9899.61 427.17,9899.61
$4N4014 on Bottom Layer "$4N4014_L02_P564" (solid, remove dead copper, pour order 564): 250,9496.06 515.75,9496.06 515.75,9712.6 250,9712.6
$4N4005 on Bottom Layer "$4N4005_L02_P557" (solid, remove dead copper, pour order 557): 397.64,9948.82 624.02,9948.82 624.02,10086.61 397.64,10086.61
$4N4005 on Bottom Layer "$4N4005_L02_P556" (solid, remove dead copper, pour order 556): 250,9742.13 397.64,9742.13 397.64,10145.67 250,10145.67
$4N4005 on Bottom Layer "$4N4005_L02_P555" (solid, remove dead copper, pour order 555): 250,10145.67 309.06,10145.67 309.06,10312.99 250,10312.99
$4N4016 on Bottom Layer "$4N4016_L02_P546" (solid, remove dead copper, pour order 546): 33.46,10175.2 161.42,10175.2 161.42,10440.94 33.46,10440.94
$4N4016 on Bottom Layer "$4N4016_L02_P545" (solid, remove dead copper, pour order 545): 161.42,10175.2 210.63,10175.2 210.63,10312.99 161.42,10312.99
$4N4016 on Bottom Layer "$4N4016_L02_P544" (solid, remove dead copper, pour order 544): 43.31,9496.06 210.63,9496.06 210.63,10175.2 43.31,10175.2
-U_VENT on Bottom Layer "-U_VENT_L02_P526" (solid, remove dead copper, pour order 526): 870.08,11976.38 1125.98,11976.38 1125.98,12133.86 870.08,12133.86
-U_VENT on Bottom Layer "-U_VENT_L02_P525" (solid, remove dead copper, pour order 525): 437.01,10864.17 653.54,10864.17 653.54,10982.28 437.01,10982.28
-U_VENT on Bottom Layer "-U_VENT_L02_P524" (solid, remove dead copper, pour order 524): 653.54,10913.39 801.18,10913.39 801.18,10982.28 653.54,10982.28
-U_VENT on Bottom Layer "-U_VENT_L02_P521" (solid, remove dead copper, pour order 521): 692.91,11287.4 889.76,11287.4 889.76,11395.67 692.91,11395.67
-U_VENT on Bottom Layer "-U_VENT_L02_P520" (solid, remove dead copper, pour order 520): 692.91,11395.67 1194.88,11395.67 1194.88,11474.41 692.91,11474.41
-U_VENT on Bottom Layer "-U_VENT_L02_P519" (solid, remove dead copper, pour order 519): 692.91,11474.41 889.76,11474.41 889.76,11661.42 692.91,11661.42
+U_VENT on Bottom Layer "+U_VENT_L02_P518" (solid, remove dead copper, pour order 518): 751.97,11868.11 771.65,11868.11 771.65,11986.22 751.97,11986.22
+U_VENT on Bottom Layer "+U_VENT_L02_P517" (solid, remove dead copper, pour order 517): 771.65,11868.11 830.71,11868.11 830.71,12242.13 771.65,12242.13
+U_VENT on Bottom Layer "+U_VENT_L02_P516" (solid, remove dead copper, pour order 516): 771.65,12242.13 1795.28,12242.13 1795.28,12389.76 771.65,12389.76
+U_VENT on Bottom Layer "+U_VENT_L02_P515" (solid, remove dead copper, pour order 515): 486.22,11789.37 653.54,11789.37 653.54,11986.22 486.22,11986.22
+U_VENT on Bottom Layer "+U_VENT_L02_P514" (solid, remove dead copper, pour order 514): 486.22,11986.22 771.65,11986.22 771.65,12389.76 486.22,12389.76
+U_VENT on Bottom Layer "+U_VENT_L02_P513" (solid, remove dead copper, pour order 513): 653.54,11710.63 751.97,11710.63 751.97,11986.22 653.54,11986.22
+U_VENT on Bottom Layer "+U_VENT_L02_P512" (solid, remove dead copper, pour order 512): 751.97,11710.63 1312.99,11710.63 1312.99,11868.11 751.97,11868.11
+U_VENT on Bottom Layer "+U_VENT_L02_P511" (solid, remove dead copper, pour order 511): 791.34,11021.65 889.76,11021.65 889.76,11159.45 791.34,11159.45
+U_VENT on Bottom Layer "+U_VENT_L02_P507" (solid, remove dead copper, pour order 507): 200.79,10864.17 377.95,10864.17 377.95,11061.02 200.79,11061.02
+U_VENT on Bottom Layer "+U_VENT_L02_P506" (solid, remove dead copper, pour order 506): 33.46,10913.39 200.79,10913.39 200.79,11061.02 33.46,11061.02
+U_VENT on Bottom Layer "+U_VENT_L02_P503" (solid, remove dead copper, pour order 503): 692.91,11159.45 889.76,11159.45 889.76,11248.03 692.91,11248.03
+U_VENT on Bottom Layer "+U_VENT_L02_P502" (solid, remove dead copper, pour order 502): 377.95,11021.65 791.34,11021.65 791.34,11061.02 377.95,11061.02
+U_VENT on Bottom Layer "+U_VENT_L02_P501" (solid, remove dead copper, pour order 501): 692.91,11061.02 791.34,11061.02 791.34,11179.13 692.91,11179.13
$4N2816 on Bottom Layer "$4N2816_L02_P497" (solid, remove dead copper, pour order 497): 43.31,11090.55 574.8,11090.55 574.8,11238.19 43.31,11238.19
-U_UM on Bottom Layer "-U_UM_L02_P494" (solid, remove dead copper, pour order 494): 230.31,11287.4 417.32,11287.4 417.32,12094.49 230.31,12094.49
-U_UM on Bottom Layer "-U_UM_L02_P492" (solid, remove dead copper, pour order 492): 407.48,11287.4 574.8,11287.4 574.8,11405.51 407.48,11405.51
+U_UM on Bottom Layer "+U_UM_L02_P488" (solid, remove dead copper, pour order 488): 43.31,11267.72 181.1,11267.72 181.1,12094.49 43.31,12094.49
+15V on Bottom Layer "+15V_L02_P483" (solid, remove dead copper, pour order 483): 3527.56,7409.45 3576.77,7409.45 3576.77,7478.35 3527.56,7478.35
+15V on Bottom Layer "+15V_L02_P479" (solid, remove dead copper, pour order 479): 2080.71,7438.98 2129.92,7438.98 2129.92,7517.72 2080.71,7517.72
GND on Bottom Layer "GND_L02_P474" (solid, remove dead copper, pour order 474): 4354.33,6976.38 4403.54,6976.38 4403.54,7438.98 4354.33,7438.98
GND on Bottom Layer "GND_L02_P473" (solid, remove dead copper, pour order 473): 3655.51,7586.61 4324.8,7586.61 4324.8,7694.88 3655.51,7694.88
GND on Bottom Layer "GND_L02_P472" (solid, remove dead copper, pour order 472): 3655.51,7694.88 4531.5,7694.88 4531.5,7901.57 3655.51,7901.57
GND on Bottom Layer "GND_L02_P471" (solid, remove dead copper, pour order 471): 4078.74,7438.98 4403.54,7438.98 4403.54,7586.61 4078.74,7586.61
GND on Bottom Layer "GND_L02_P470" (solid, remove dead copper, pour order 470): 4295.28,8866.14 4748.03,8866.14 4748.03,8935.04 4295.28,8935.04
GND on Bottom Layer "GND_L02_P468" (solid, remove dead copper, pour order 468): 6480.31,10952.76 6549.21,10952.76 6549.21,10982.28 6480.31,10982.28
GND on Bottom Layer "GND_L02_P467" (solid, remove dead copper, pour order 467): 5909.45,10834.65 6234.25,10834.65 6234.25,10952.76 5909.45,10952.76
GND on Bottom Layer "GND_L02_P466" (solid, remove dead copper, pour order 466): 2120.08,9151.57 2248.03,9151.57 2248.03,9437.01 2120.08,9437.01
GND on Bottom Layer "GND_L02_P465" (solid, remove dead copper, pour order 465): 2218.5,8905.51 2316.93,8905.51 2316.93,8974.41 2218.5,8974.41
GND on Bottom Layer "GND_L02_P464" (solid, remove dead copper, pour order 464): 1775.59,8974.41 2316.93,8974.41 2316.93,9151.57 1775.59,9151.57
GND on Bottom Layer "GND_L02_P463" (solid, remove dead copper, pour order 463): 2218.5,8688.98 2602.36,8688.98 2602.36,8905.51 2218.5,8905.51
GND on Bottom Layer "GND_L02_P462" (solid, remove dead copper, pour order 462): 1834.65,8688.98 2218.5,8688.98 2218.5,8974.41 1834.65,8974.41
GND on Bottom Layer "GND_L02_P461" (solid, remove dead copper, pour order 461): 1874.02,9151.57 2120.08,9151.57 2120.08,9643.7 1874.02,9643.7
GND on Bottom Layer "GND_L02_P460" (solid, remove dead copper, pour order 460): 6549.21,9427.17 6687.01,9427.17 6687.01,10982.28 6549.21,10982.28
GND on Bottom Layer "GND_L02_P459" (solid, remove dead copper, pour order 459): 6578.74,11139.76 6687.01,11139.76 6687.01,11238.19 6578.74,11238.19
GND on Bottom Layer "GND_L02_P458" (solid, remove dead copper, pour order 458): 6381.89,11139.76 6578.74,11139.76 6578.74,11877.95 6381.89,11877.95
GND on Bottom Layer "GND_L02_P457" (solid, remove dead copper, pour order 457): 5633.86,10952.76 6480.31,10952.76 6480.31,10982.28 5633.86,10982.28
GND on Bottom Layer "GND_L02_P456" (solid, remove dead copper, pour order 456): 5358.27,10854.33 5633.86,10854.33 5633.86,11257.87 5358.27,11257.87
GND on Bottom Layer "GND_L02_P455" (solid, remove dead copper, pour order 455): 5633.86,10982.28 6687.01,10982.28 6687.01,11139.76 5633.86,11139.76
GND on Bottom Layer "GND_L02_P454" (solid, remove dead copper, pour order 454): 3734.25,8748.03 4295.28,8748.03 4295.28,8935.04 3734.25,8935.04
GND on Bottom Layer "GND_L02_P453" (solid, remove dead copper, pour order 453): 3734.25,8935.04 5161.42,8935.04 5161.42,9171.26 3734.25,9171.26
GND on Bottom Layer "GND_L02_P452" (solid, remove dead copper, pour order 452): 5417.32,8925.2 5801.18,8925.2 5801.18,9043.31 5417.32,9043.31
GND on Bottom Layer "GND_L02_P451" (solid, remove dead copper, pour order 451): 5161.42,8915.35 5417.32,8915.35 5417.32,11129.92 5161.42,11129.92
GND on Bottom Layer "GND_L02_P450" (solid, remove dead copper, pour order 450): 5515.75,9043.31 5879.92,9043.31 5879.92,10194.88 5515.75,10194.88
GND on Bottom Layer "GND_L02_P449" (solid, remove dead copper, pour order 449): 5417.32,10194.88 5889.76,10194.88 5889.76,10854.33 5417.32,10854.33
GND on Bottom Layer "GND_L02_P394" (solid, remove dead copper, pour order 394): 3625.98,7124.02 3694.88,7124.02 3694.88,7183.07 3625.98,7183.07
GND on Bottom Layer "GND_L02_P393" (solid, remove dead copper, pour order 393): 2188.98,7124.02 2248.03,7124.02 2248.03,7183.07 2188.98,7183.07
$2N3778 on Bottom Layer "$2N3778_L02_P386" (solid, remove dead copper, pour order 386): 3625.98,7025.59 3665.35,7025.59 3665.35,7104.33 3625.98,7104.33